# Altium PCB RADAR_D79_POWER_24V_v0.9.3.37_R10_3_37_REZONIT_IMPEDANCE_RECALC_ASCII.PcbDoc (part 7 of 8)
Units mil, origin at the board's own origin, x right, y up, seen from the top; angles counter-clockwise.
Board outline 3110.24 x 3110.24 mil, 10 copper layers (Top Layer, RF_GND, SIG_A0, SIG_A1, PWR_A, PWR_B, SIG_B1, SIG_B0, DIGITAL_GND, Bottom Layer), stack 80 mil thick; 304 components, 269 nets, 1408 pads, 1372 vias.
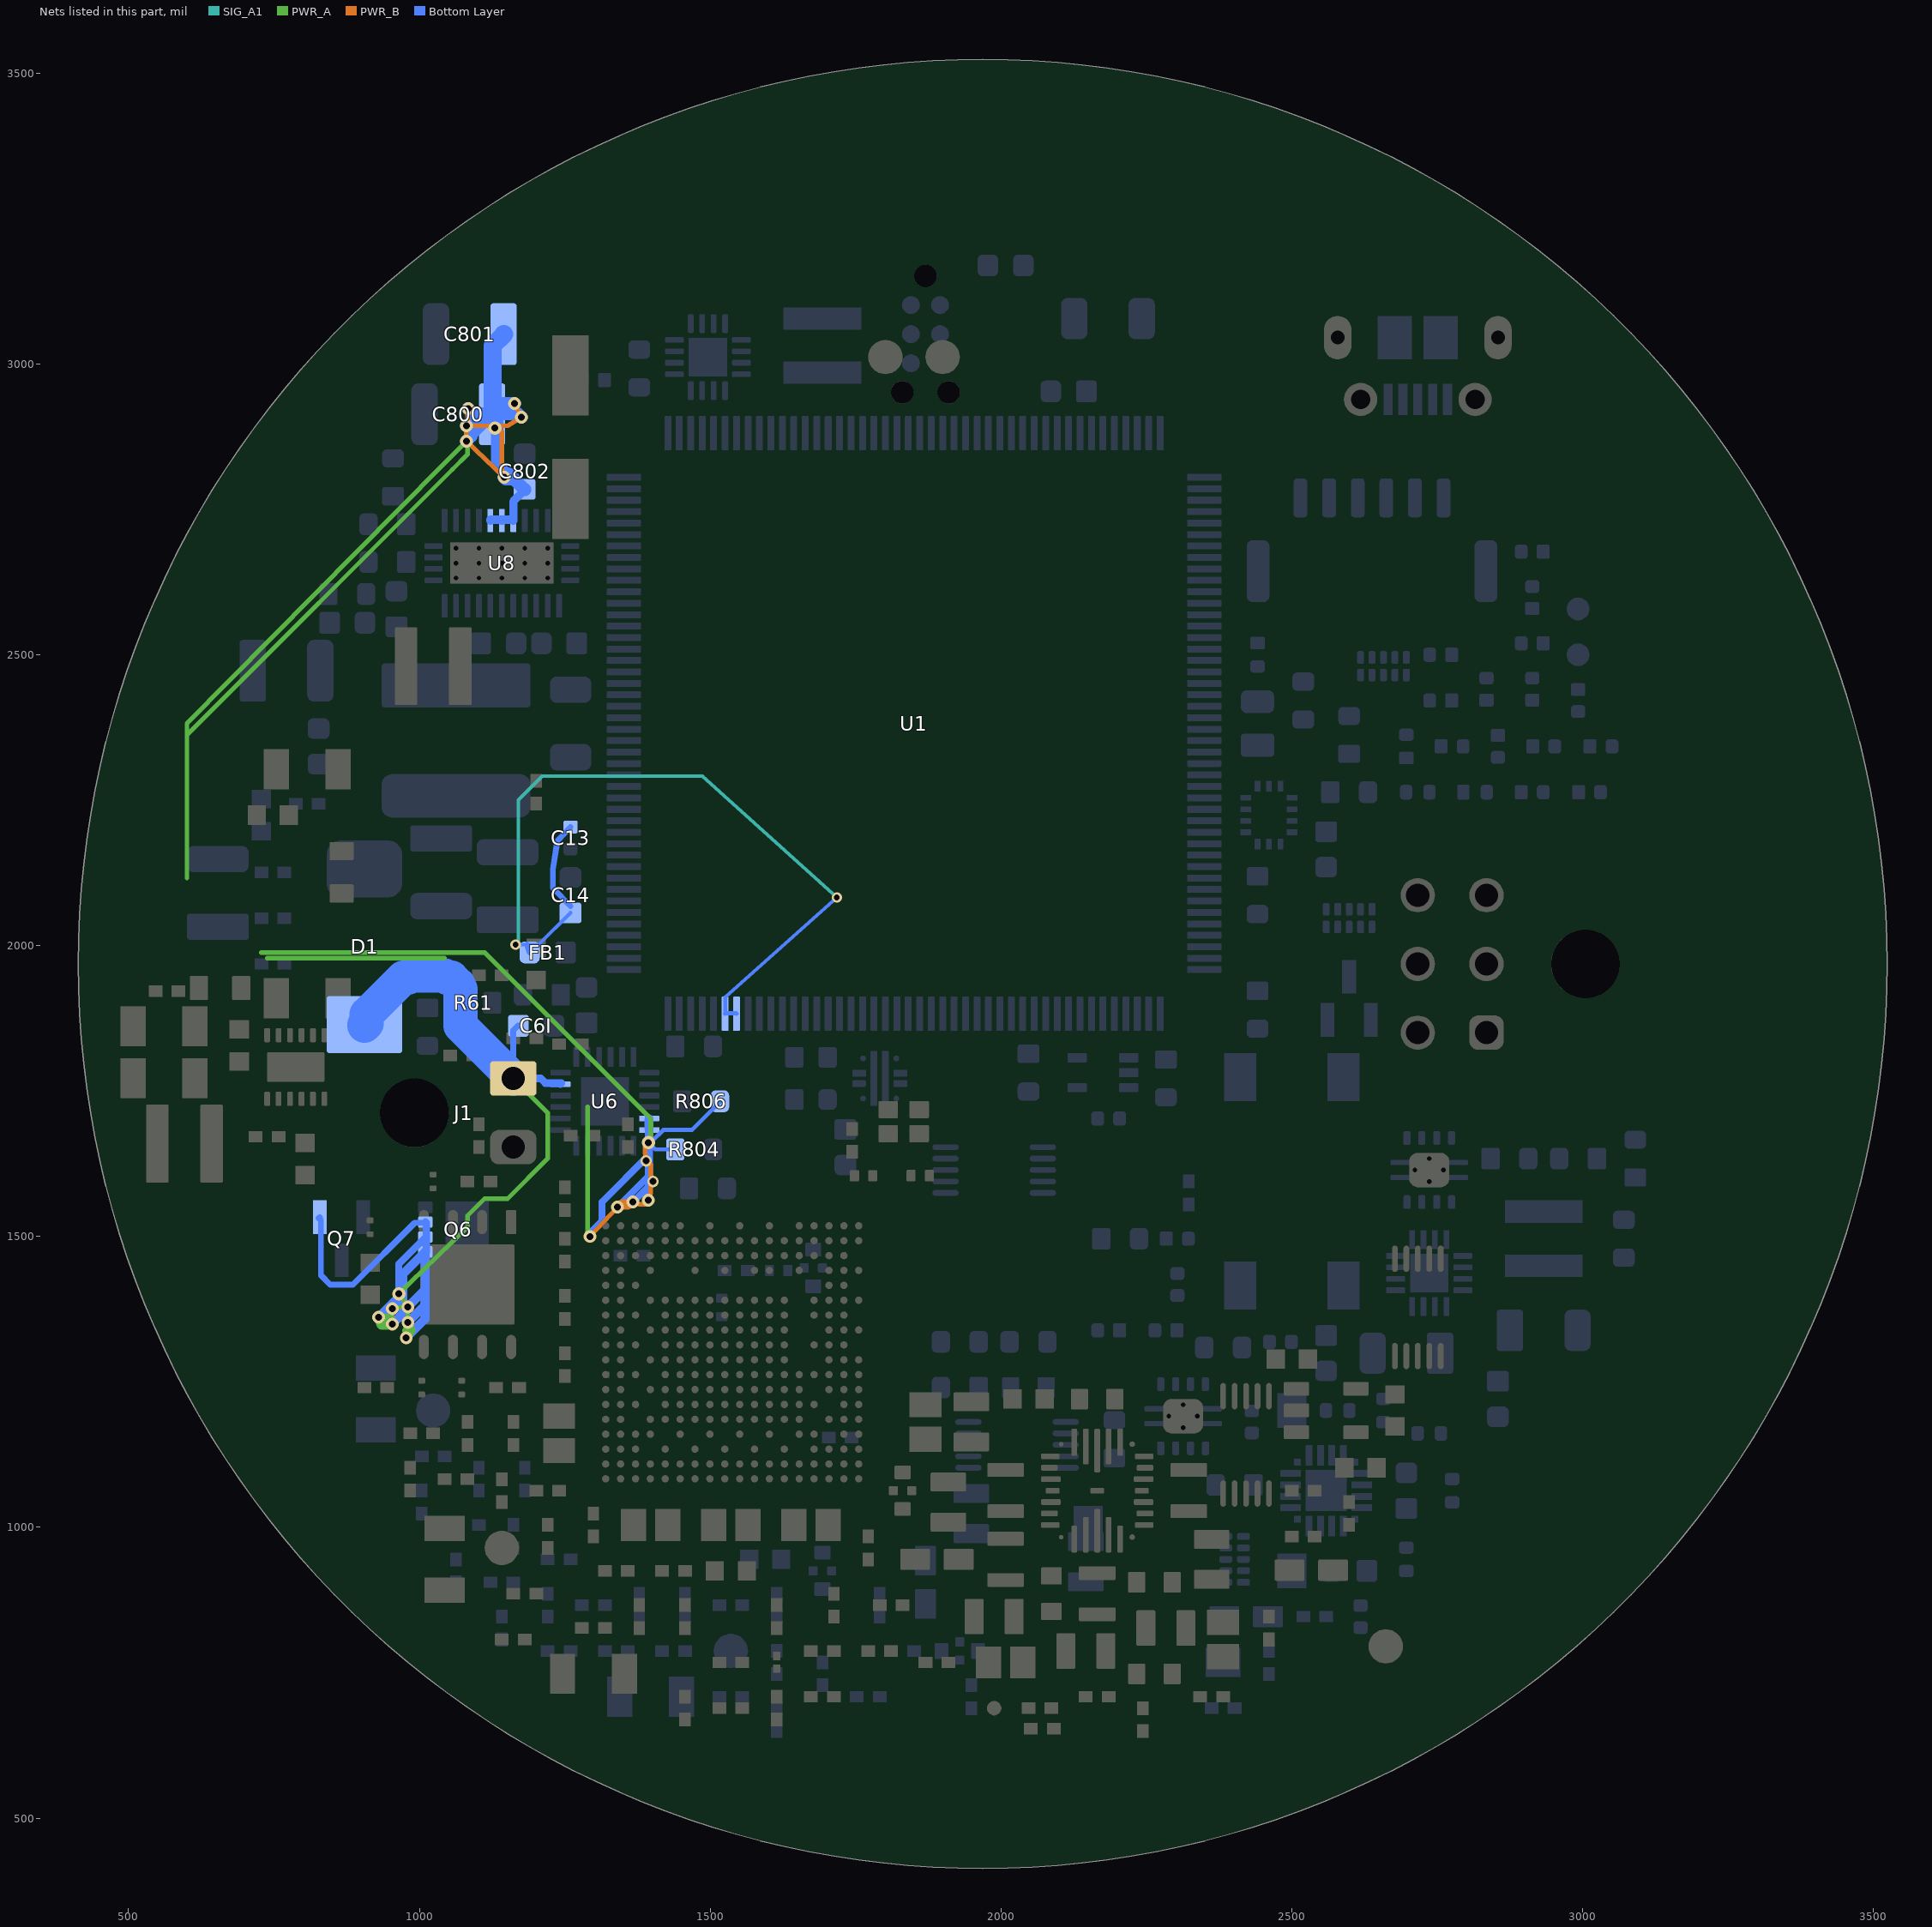
[diagram p13: the nets of this part, all layers, seen from the top]

## Via types
v1: diameter 13.77, hole 5.9, Top Layer to SIG_A0, tented both sides, 513 vias
v2: diameter 19.68, hole 9.84, Top Layer to Bottom Layer, tented both sides, 196 vias
v3: diameter 17.72, hole 9.84, Top Layer to Bottom Layer, tented both sides, 188 vias
v4: diameter 13.77, hole 5.9, Top Layer to SIG_A0, tented top, 104 vias
v5: diameter 13.78, hole 5.91, Top Layer to SIG_A0, tented both sides, 83 vias
v6: diameter 13.78, hole 5.91, SIG_B0 to Bottom Layer, tented both sides, 74 vias
v7: diameter 13.78, hole 5.91, Top Layer to SIG_A0, tented bottom, 55 vias
v8: diameter 13.78, hole 5.91, SIG_B0 to Bottom Layer, tented top, 43 vias
v9: diameter 22.05, hole 11.81, Top Layer to Bottom Layer, tented both sides, 23 vias
v10: diameter 16.54, hole 7.87, SIG_B0 to Bottom Layer, tented both sides, 22 vias
v11: diameter 17.72, hole 9.84, Top Layer to Bottom Layer, 14 vias
v12: diameter 22.83, hole 11.81, Top Layer to Bottom Layer, tented both sides, 11 vias
v13: diameter 16.54, hole 7.87, Top Layer to Bottom Layer, tented both sides, 11 vias
v14: diameter 18.11, hole 9.06, Top Layer to Bottom Layer, tented both sides, 8 vias
v15: diameter 17.32, hole 8.66, Top Layer to Bottom Layer, tented both sides, 3 vias
v16: diameter 20.47, hole 9.84, Top Layer to Bottom Layer, tented both sides, 3 vias
v17: diameter 16.54, hole 7.87, Top Layer to Bottom Layer, 3 vias
v18: diameter 22.05, hole 11.02, Top Layer to Bottom Layer, tented both sides, 2 vias
v19: diameter 19.68, hole 11.81, Top Layer to Bottom Layer, tented both sides, 2 vias
v20: diameter 19.68, hole 9.84, SIG_A1 to Bottom Layer, tented both sides, 2 vias
v21: diameter 16.54, hole 7.87, SIG_A1 to SIG_B1, tented both sides, 2 vias
v22: diameter 16.54, hole 7.87, Top Layer to SIG_A1, 2 vias
v23: diameter 13.78, hole 5.91, Top Layer to SIG_A0, 2 vias
v24: diameter 18, hole 9.84, Top Layer to Bottom Layer, tented both sides, 1 vias
v25: diameter 19.68, hole 9.84, SIG_B0 to Bottom Layer, tented both sides, 1 vias
v26: diameter 17.32, hole 7.87, Top Layer to Bottom Layer, tented both sides, 1 vias
v27: diameter 17.32, hole 7.87, SIG_A1 to Bottom Layer, tented both sides, 1 vias
v28: diameter 19.68, hole 9.84, SIG_B1 to Bottom Layer, tented both sides, 1 vias
v29: diameter 16.54, hole 7.87, PWR_B to SIG_A0, tented both sides, 1 vias

## Nets (pads, with @x,y where several pads share a name; then routed paths per layer and width w, separated by ;. In a path a pad name is that pad's centre, name@x,y a point inside that pad or via, vN(x,y) a via of type N, cw(c..) or ccw(c..) an arc to the next point about the centre after c; other vN are vias at no path point) (continued)
VDDA_FILTERED: C13.1 C14.1 FB1.2 U1.38 U1.39 | length 1492.1
  SIG_A1 w6.3: v3(1165.35,2001.57) 1170.08,2006.3 1170.08,2250.39 1211.02,2291.34 1486.61,2291.34 v3(1717.52,2082.68)
  Bottom Layer w6.3: v3(1165.35,2001.57) 1204.72,2001.57 1259.84,2056.69 C14.1@1259.84,2056.1 ; U1.39@1525.59,1882.87 1525.98,1883.46 1525.98,1911.81 v3(1717.52,2082.68)
  Bottom Layer w7.09: U1.39@1525.59,1882.87 1526.57,1883.86 1544.29,1883.86 U1.38@1545.28,1882.87
  Bottom Layer w9.84: FB1.2@1185.04,2001.57 FB1.2@1189.47,1988.19 ; C14.1@1259.84,2067.52 1229.33,2099.41 1229.33,2130.91 1237.2,2180.12 C13.1@1259.84,2203.94
VIN_PROTECTED_24V: C800.1 C801.1 C802.1 R804.1 R806.2 U6.17 U6.18 U8.20 U8.21 U8.22 | length 5751.8
  PWR_A w7.87: 728.35,1988.19 1112.2,1988.19 1385.56,1714.83 1397.64,1702.76 1397.64,1673.23 v12(1393.7,1661.42) ; 738.19,1978.35 1043.31,1978.35 ; 1289.37,1722.44 1289.37,1557.86 1289.37,1505.91 v9(1293.31,1500) ; 600.39,2116.14 600.39,2381.89 1039.16,2825.16 v9(1080.71,2867.13) 1082.68,2854.33 1082.68,2844.49 1057.03,2818.84 600.39,2362.2 600.39,2116.14
  PWR_B w7.87: v9(1083.66,2923.23) 1082.68,2913.39 1082.68,2903.54 v9(1080.71,2893.7) ; v9(1163.39,2932.09) v9(1175.2,2908.46) 1151.57,2893.7 1141.73,2893.7 v12(1129.92,2889.76) ; v9(1293.31,1500) v9(1340.55,1550.2) 1348.43,1555.12 1358.27,1555.12 v9(1367.13,1559.06) 1377.95,1555.12 1387.8,1555.12 v9(1393.7,1562.01) 1397.64,1574.8 1397.64,1584.65 v19(1401.57,1594.49) 1397.64,1604.33 1397.64,1624.02 v19(1389.76,1629.92) 1387.8,1643.7 1387.8,1653.54 v12(1393.7,1661.42) ; v9(1080.71,2893.7) 1122.05,2893.7 v12(1129.92,2889.76) ; v9(1080.71,2893.7) v9(1080.71,2867.13) v9(1145.67,2805.12) 1141.73,2814.96 1141.73,2883.86 v12(1129.92,2889.76)
  PWR_B w17.72: v9(1340.55,1550.2) 1348.43,1555.12 1358.27,1555.12 v9(1367.13,1559.06)
  Bottom Layer w7.09: R804.1@1439.96,1649.61 1405.51,1649.61 v12(1393.7,1661.42) 1395.67,1663.39 1399.61,1663.39 1419.29,1683.07 1468.5,1683.07 1517.72,1732.28 R806.2@1516.73,1732.28
  Bottom Layer w11.81: C800.1@1125,2913.39 1125.98,2913.39 1125.98,2893.7 v12(1129.92,2889.76) ; v9(1293.31,1500) 1296.26,1502.95 1296.26,1508.86 1313.98,1526.57 1313.98,1559.06 1393.7,1638.78 1393.7,1683.07 U6.18@1395.18,1683.07 ; v9(1340.55,1550.2) 1393.7,1603.35 U6.17@1393.7,1703.74 ; v9(1367.13,1559.06) 1393.7,1585.63 U6.17@1393.7,1703.74 ; v19(1389.76,1629.92) 1395.67,1635.83 1395.67,1683.07 U6.18@1395.18,1683.07 ; v9(1393.7,1562.01) U6.17@1393.7,1703.74 ; v12(1393.7,1661.42) 1393.7,1685.04 U6.18@1395.18,1683.07 ; v19(1401.57,1594.49) 1395.67,1600.39 1395.67,1702.76 U6.17@1395.18,1702.76 U6.17@1393.7,1703.74
  Bottom Layer w13.78: U8.22@1161.42,2730.81 1161.42,2732.28 1161.42,2763.78 1181.1,2783.46 C802.1@1181.1,2784.45 ; U6.18@1395.18,1683.07 1393.7,1685.04 1393.7,1700.79 U6.17@1395.18,1702.76
  Bottom Layer w14.96: U8.20@1122.05,2730.81 1122.05,2732.28 U8.21@1141.73,2732.28 ; U8.21@1141.73,2730.81 U8.21@1141.73,2732.28 ; U8.22@1161.42,2730.81 1161.42,2732.28 U8.21@1141.73,2732.28
  Bottom Layer w21.65: v9(1080.71,2867.13) 1089.57,2875.98 1089.57,2878.94 C800.1@1125,2914.37 ; v9(1080.71,2893.7) 1101.38,2914.37 C800.1@1125,2914.37 ; v9(1083.66,2923.23) 1092.52,2914.37 C800.1@1125,2914.37 ; v9(1145.67,2805.12) 1148.62,2802.17 1163.39,2802.17 C802.1@1181.1,2784.45 1181.1,2783.46 1153.54,2811.02 1149.61,2811.02 1133.86,2826.77 1133.86,2905.51 1125.98,2913.39 C800.1@1125,2913.39 C800.1@1125,2914.37 ; v9(1163.39,2932.09) 1142.72,2932.09 C800.1@1125,2914.37 ; v9(1175.2,2908.46) 1169.29,2914.37 C800.1@1125,2914.37
  Bottom Layer w31.5: C800.1@1125,2913.39 1125.98,2913.39 1125.98,3031.5 1145.67,3051.18 C801.1@1144.69,3051.18
VIN_RAW: C6I.1 D1.1 J1.1 Q6.1 Q6.2 Q6.3 Q7.2 R61.1 U6.5 | length 2773.8
  PWR_A w7.87: v9(930.12,1361.22) 935.04,1348.43 944.88,1348.43 v9(953.74,1349.41) v9(953.74,1375.98) 964.57,1377.95 974.41,1377.95 v9(980.32,1378.94) ; v9(977.36,1325.79) 974.41,1338.58 v9(980.32,1352.36) v9(980.32,1378.94) ; J1.1@1161.42,1771.65 1203.18,1729.9 1220.47,1712.6 1220.47,1633.86 1151.57,1564.96 1112.2,1564.96 1082.68,1535.43 1082.68,1515.75 1007.03,1442.62 v12(964.57,1401.57) v9(980.32,1378.94)
  PWR_A w17.72: v9(977.36,1325.79) 984.25,1338.58 v9(980.32,1352.36) ; v9(930.12,1361.22) 935.04,1358.27 944.88,1358.27 v9(953.74,1349.41) 944.88,1348.43 935.04,1348.43 v9(930.12,1361.22)
  Bottom Layer w9.84: R61.1@1060.04,1901.57 1059.06,1901.57 1094.49,1866.14 1094.49,1838.58 J1.1@1161.42,1771.65
  Bottom Layer w10.24: Q7.2@828.74,1532.97 826.77,1531.5 830.71,1527.56 830.71,1433.07 846.46,1417.32 885.83,1417.32 992.13,1523.62 1011.81,1523.62 Q6.3@1010.24,1524.8
  Bottom Layer w10.63: J1.1@1161.42,1771.65 1161.42,1854.33 1169.29,1862.2 C6I.1@1170.28,1862.2
  Bottom Layer w12.2: v12(964.57,1401.57) 964.57,1452.76 1011.81,1500 Q6.2@1010.24,1498.82
  Bottom Layer w12.6: Q6.1@1010.24,1473.62 1011.81,1472.44 Q6.2@1011.81,1500 ; Q6.2@1010.24,1498.82 Q6.2@1011.81,1500 ; Q6.3@1010.24,1524.8 1011.81,1523.62 Q6.2@1011.81,1500
  Bottom Layer w12.99: J1.1@1161.42,1771.65 1208.66,1771.65 1216.54,1763.78 1244.09,1763.78 U6.5@1242.62,1761.81
  Bottom Layer w14.96: v9(930.12,1361.22) 971.46,1402.56 971.46,1435.04 ; v9(953.74,1349.41) 971.46,1367.13 971.46,1435.04 ; v9(953.74,1375.98) 971.46,1393.7 971.46,1435.04 ; v9(977.36,1325.79) 1009.84,1358.27 Q6.1@1009.84,1473.43 ; v9(980.32,1352.36) 1009.84,1381.89 Q6.1@1009.84,1473.43 ; v9(980.32,1378.94) 1009.84,1408.46 Q6.1@1009.84,1473.43 ; Q6.1@1010.24,1473.62 Q6.1@1009.84,1473.43 ; 971.46,1435.04 Q6.1@1009.84,1473.43
  Bottom Layer w59.06: D1.1@905.51,1864.17 905.51,1862.2 909.45,1866.14 909.45,1881.89 972.44,1944.88 980.32,1944.88 984.25,1948.82 1043.31,1948.82 1047.24,1944.88 1055.12,1944.88 1066.93,1933.07 1066.93,1929.13 1070.87,1925.2 1070.87,1862.2 J1.1@1161.42,1771.65
pads on no net: D3.6 D3.7 D3.9 D3.10 D8.5 D8.6 D8.7 D8.9 D8.10 D_USB.5 D_USB.6 D_USB.7 D_USB.9 D_USB.10 J1.Un1 J6.Un1 J8.5 J8.MP J10.Un1 J10.Un2 J10.Un3 JUSB1.4 JUSB1.7 JUSB1.8 Q6.Un1 Q6.Un2 Q6.Un3 Q6.Un4 Q6.Un5 Q6.Un6 Q6.Un7 Q6.Un8 RAD_U2.11 RAD_U9.3 RAD_U11.3 RAD_U12.3 RAD_U22.3 RAD_U27.4 U1.3 U1.4 U1.5 U1.7 U1.8 U1.9 U1.10 U1.11 U1.12 U1.13 U1.16 U1.17 U1.18 U1.19 U1.20 U1.21 U1.24 U1.25 U1.26 U1.27 U1.28 U1.30 U1.32 U1.33 U1.34 U1.35 U1.41 U1.42 U1.43 U1.44 U1.45 U1.46 U1.47 U1.50 U1.51 U1.52 U1.53 U1.54 U1.55 U1.56 U1.57 U1.58 U1.59 U1.60 U1.63 U1.64 U1.65 U1.66 U1.67 U1.68 U1.69 U1.70 U1.73 U1.74 U1.75 U1.76 U1.77 U1.78 U1.83 U1.84 U1.85 U1.86 U1.87 U1.88 U1.89 U1.98 U1.99 U1.100 U1.101 U1.104 U1.105 U1.106 U1.107 U1.108 U1.109 U1.110 U1.111 U1.112 U1.115 U1.116 U1.117 U1.118 U1.119 U1.122 U1.123 U1.128 U1.129 U1.130 U1.131 U1.132 U1.133 U1.134 U1.138 U1.139 U1.140 U1.141 U1.144 U1.145 U1.146 U1.151 U1.152 U1.153 U1.154 U1.155 U1.156 U1.157 U1.160 U1.162 U1.163 U1.164 U1.165 U1.167 U1.168 U1.169 U1.170 U1.173 U1.174 U1.175 U1.176 U2.2 U2.3 U2.10 U2.11 U4.Un1 U4.Un2 U4.Un3 U4.Un4 U4.Un5 U5.7 U5.8 U5.Un1 U5.Un2 U5.Un3 U5.Un4 U6.12 U6.13 U6.19 U6.20 U6.21 U6.22 U6.23 U6.24 U6.Un1 U6.Un2 U6.Un3 U6.Un4 U7.3 U7.10 U7.Un1 U7.Un2 U7.Un3 U7.Un4 U8.7 U8.11 U8.23 U8.Un1 U8.Un2 U8.Un3 U8.Un4 U8.Un5 U8.Un6 U8.Un7 U8.Un8 U9.7 U9.8 U9.Un1 U9.Un2 U9.Un3 U9.Un4 U_CAN_RAD.Un1 U_CAN_RAD.Un2 U_CAN_RAD.Un3 U_CAN_RAD.Un4 U_CAN_RAD.Un5 U_FRAME.1 U_USB.1 U_USB.2 U_USB.10 U_USB.11 U_USB.14 U_USB.16 U_USB.19 U_USB.20 U_USB.P1 U_USB.P2 U_USB.P3 U_USB.P4 Y1.1

## Polygon pours and split planes (outlines as drawn)
TI_NetC21_2 on Top Layer "TI_NetC21_2" (solid, remove dead copper, pour order 0): 744.76,1750.23 615.47,1750.23 615.47,1558.2 737.3,1558.2 737.3,1699.8 744.76,1699.8
RADAR_12V on Top Layer "RADAR_12V" (solid, remove dead copper, pour order 1): 812.99,1930.08 748.03,1865.12 748.03,1834.07 665.45,1834.07 665.45,1968.5 812.99,1968.5
GND on Top Layer "GND" (solid, remove dead copper, pour order 2): 812.99,1756.35 598.43,1756.35 598.43,1968.5 640.28,1968.5 640.28,1814.86 812.99,1814.86
GND on SIG_A0 "GND1_REFERENCE" (solid, remove dead copper, pour order 3): 96 vertices, not listed, extent 454.72,454.72 2635.41,3482.28
GND on SIG_B0 "GND2_REFERENCE" (solid, remove dead copper, pour order 4): 145 vertices, not listed, extent 462.6,462.6 3474.41,3474.41
GND on Bottom Layer "GND_BOTTOM_RETURN" (solid, remove dead copper, pour order 5): 145 vertices, not listed, extent 462.6,462.6 3474.41,3474.41
GND on Top Layer "GND_COPLANAR_FEED_REFERENCE" (solid, remove dead copper, pour order 6): 2624.02,1830.71 2624.02,1200.79 1318.9,1200.79 1318.9,1830.71
GND on Top Layer "GND_TOP_DIGITAL_RETURN" (solid, remove dead copper, pour order 7): 1141.73,748.03 2066.93,748.03 2066.93,1190.94 1141.73,1190.94
GND on RF_GND "RF_GND_REFERENCE" (solid, remove dead copper, pour order 17): 96 vertices, not listed, extent 454.72,454.72 2635.41,3482.28
GND on DIGITAL_GND "DIGITAL_GND_REFERENCE" (solid, remove dead copper, pour order 18): 96 vertices, not listed, extent 454.72,454.72 2635.41,3482.28
TI_PVIN3V3 on PWR_A "R10_3_28_TI_PVIN3V3_19" (solid, pour order 19): 1843.82,838.63 1838.53,828.07 1872.72,810.97 1878,821.54
TI_PVIN3V3 on PWR_A "R10_3_28_TI_PVIN3V3_20" (solid, pour order 20): 1864.17,824.8 1864.17,812.99 1903.54,812.99 1903.54,824.8
TI_PVIN3V3 on PWR_A "R10_3_28_TI_PVIN3V3_21" (solid, pour order 21): 2435.34,812.62 2423.6,811.32 2425.89,790.72 2437.62,792.03
TI_PVIN3V3 on PWR_A "R10_3_28_TI_PVIN3V3_22" (solid, pour order 22): 2437.01,803.15 2425.2,803.15 2425.2,781.5 2437.01,781.5
TI_PVIN3V3 on PWR_A "R10_3_28_TI_PVIN3V3_23" (solid, pour order 23): 2434.39,795.08 2423.43,790.69 2429.78,774.8 2440.75,779.19
TI_PVIN3V3 on PWR_A "R10_3_28_TI_PVIN3V3_24" (solid, pour order 24): 1892.78,825.69 1890.84,814.04 1914.3,810.13 1916.24,821.78
TI_PVIN3V3 on PWR_A "R10_3_28_TI_PVIN3V3_25" (solid, pour order 25): 1903.54,822.83 1903.54,811.02 1954.72,811.02 1954.72,822.83
TI_PVIN3V3 on PWR_A "R10_3_28_TI_PVIN3V3_26" (solid, pour order 26): 1940.47,817.23 1948.52,808.58 1962.81,821.88 1954.77,830.53
TI_PVIN3V3 on PWR_A "R10_3_28_TI_PVIN3V3_27" (solid, pour order 27): 1921.08,823.39 1953.26,788.8 2046.05,875.11 2013.87,909.7
TI_PVIN3V3 on PWR_A "R10_3_28_TI_PVIN3V3_28" (solid, pour order 28): 2004.32,876.62 2012.36,867.97 2064.25,916.23 2056.21,924.88
TI_PVIN3V3 on PWR_A "R10_3_28_TI_PVIN3V3_29" (solid, pour order 29): 2062.55,911.48 2060.96,923.18 2040.59,920.41 2042.19,908.71
TI_PVIN3V3 on PWR_A "R10_3_28_TI_PVIN3V3_30" (solid, pour order 30): 2053.15,909.45 2053.15,921.26 2031.5,921.26 2031.5,909.45
TI_PVIN3V3 on PWR_A "R10_3_28_TI_PVIN3V3_31" (solid, pour order 31): 2037.4,907 2045.75,915.35 2027.56,933.55 2019.21,925.2
TI_PVIN3V3 on PWR_A "R10_3_28_TI_PVIN3V3_32" (solid, pour order 32): 2021.65,919.29 2033.46,919.29 2033.46,957.65 2021.65,957.65
TI_PVIN3V3 on PWR_A "R10_3_28_TI_PVIN3V3_33" (solid, pour order 33): 2003.94,928.13 2051.18,928.13 2051.18,1037.24 2003.94,1037.24
TI_PVIN3V3 on PWR_A "R10_3_28_TI_PVIN3V3_34" (solid, pour order 34): 2021.65,1007.71 2033.46,1007.71 2033.46,1049.21 2021.65,1049.21
TI_PVIN3V3 on PWR_A "R10_3_28_TI_PVIN3V3_35" (solid, pour order 35): 2019.24,1042.52 2028.35,1034.99 2054.57,1066.74 2045.47,1074.26
TI_PVIN3V3 on PWR_A "R10_3_28_TI_PVIN3V3_36" (solid, pour order 36): 2046.72,1057.61 2054.6,1066.41 2027.1,1091.02 2019.22,1082.21
TI_PVIN3V3 on PWR_A "R10_3_28_TI_PVIN3V3_37" (solid, pour order 37): 2021.65,1076.77 2033.46,1076.77 2033.46,1122.54 2021.65,1122.54
TI_PVIN3V3 on PWR_A "R10_3_28_TI_PVIN3V3_38" (solid, pour order 38): 2003.94,1093.02 2051.18,1093.02 2051.18,1175.2 2003.94,1175.2
TI_PVIN3V3 on PWR_A "R10_3_28_TI_PVIN3V3_39" (solid, pour order 39): 1994.15,1151.57 2027.56,1118.17 2070.81,1161.42 2037.4,1194.82
TI_PVIN3V3 on PWR_A "R10_3_28_TI_PVIN3V3_40" (solid, pour order 40): 2013.78,1185.04 2013.78,1137.8 2139.32,1137.8 2139.32,1185.04
TI_PVIN3V3 on PWR_A "R10_3_28_TI_PVIN3V3_41" (solid, pour order 41): 2109.79,1167.32 2109.79,1155.51 2141.73,1155.51 2141.73,1167.32
TI_PVIN3V3 on PWR_A "R10_3_28_TI_PVIN3V3_42" (solid, pour order 42): 2127.49,1160.85 2136.39,1153.09 2169.75,1191.32 2160.85,1199.08
TI_PVIN3V3 on PWR_A "R10_3_28_TI_PVIN3V3_43" (solid, pour order 43): 2169.72,1191.63 2160.54,1199.05 2137.36,1170.38 2146.55,1162.95
TI_PVIN3V3 on PWR_A "R10_3_28_TI_PVIN3V3_44" (solid, pour order 44): 2151.57,1165.35 2151.57,1177.17 2111.52,1177.17 2111.52,1165.35
TI_PVIN3V3 on PWR_A "R10_3_28_TI_PVIN3V3_45" (solid, pour order 45): 2141.05,1147.64 2141.05,1194.88 2092.52,1194.88 2092.52,1147.64
TI_PVIN3V3 on PWR_A "R10_3_28_TI_PVIN3V3_46" (solid, pour order 46): 2116.14,1137.85 2149.55,1171.26 2079.36,1241.44 2045.96,1208.04
TI_PVIN3V3 on PWR_A "R10_3_28_TI_PVIN3V3_47" (solid, pour order 47): 2079.36,1199.69 2087.72,1208.04 2047.24,1248.51 2038.89,1240.16
TI_PVIN3V3 on PWR_A "R10_3_28_TI_PVIN3V3_48" (solid, pour order 48): 2041.34,1234.25 2053.15,1234.25 2053.15,1253.94 2041.34,1253.94
TI_PVIN3V3 on PWR_A "R10_3_28_TI_PVIN3V3_49" (solid, pour order 49): 2169.72,1191.63 2160.54,1199.05 2137.36,1170.38 2146.55,1162.95
TI_PVIN3V3 on PWR_A "R10_3_28_TI_PVIN3V3_50" (solid, pour order 50): 2151.57,1177.17 2139.76,1177.17 2139.76,1131.35 2151.57,1131.35
TI_PVIN3V3 on PWR_A "R10_3_28_TI_PVIN3V3_51" (solid, pour order 51): 2169.29,1160.88 2122.05,1160.88 2122.05,1108.27 2169.29,1108.27
TI_PVIN3V3 on PWR_A "R10_3_28_TI_PVIN3V3_52" (solid, pour order 52): 2145.67,1165.3 2112.26,1131.89 2155.51,1088.64 2188.92,1122.05
TI_PVIN3V3 on PWR_A "R10_3_28_TI_PVIN3V3_53" (solid, pour order 53): 2131.89,1145.67 2131.89,1098.43 2218.5,1098.43 2218.5,1145.67
TI_PVIN3V3 on PWR_A "R10_3_28_TI_PVIN3V3_54" (solid, pour order 54): 2194.88,1155.45 2161.48,1122.05 2222.98,1060.55 2256.38,1093.95
TI_PVIN3V3 on PWR_A "R10_3_28_TI_PVIN3V3_55" (solid, pour order 55): 2222.98,1102.3 2214.63,1093.95 2234.25,1074.33 2242.6,1082.68
TI_PVIN3V3 on PWR_A "R10_3_28_TI_PVIN3V3_56" (solid, pour order 56): 2228.35,1088.58 2228.35,1076.77 2283.27,1076.77 2283.27,1088.58
TI_PVIN3V3 on PWR_A "R10_3_28_TI_PVIN3V3_57" (solid, pour order 57): 2284.98,1086.1 2273.94,1090.3 2266,1069.41 2277.04,1065.22
TI_PVIN3V3 on PWR_A "R10_3_28_TI_PVIN3V3_58" (solid, pour order 58): 2279.53,1078.74 2267.72,1078.74 2267.72,1037.4 2279.53,1037.4
TI_PVIN3V3 on PWR_A "R10_3_28_TI_PVIN3V3_59" (solid, pour order 59): 2273.62,1051.66 2265.27,1043.31 2287.06,1021.52 2295.41,1029.87
TI_PVIN3V3 on PWR_A "R10_3_28_TI_PVIN3V3_60" (solid, pour order 60): 2287.06,1063.28 2253.65,1029.87 2342.52,941 2375.93,974.41
TI_PVIN3V3 on PWR_A "R10_3_28_TI_PVIN3V3_61" (solid, pour order 61): 2366.14,998.03 2318.9,998.03 2318.9,933.36 2366.14,933.36
TI_PVIN3V3 on PWR_A "R10_3_28_TI_PVIN3V3_62" (solid, pour order 62): 2348.43,962.88 2336.61,962.88 2336.61,948.82 2348.43,948.82
TI_PVIN3V3 on PWR_A "R10_3_28_TI_PVIN3V3_63" (solid, pour order 63): 2350.87,954.72 2342.52,963.08 2314.48,935.04 2322.83,926.69
TI_PVIN3V3 on PWR_A "R10_3_28_TI_PVIN3V3_64" (solid, pour order 64): 2328.74,929.13 2328.74,940.94 2297.24,940.94 2297.24,929.13
TI_PVIN3V3 on PWR_A "R10_3_28_TI_PVIN3V3_65" (solid, pour order 65): 2307.03,927.65 2310.54,938.92 2290.41,945.19 2286.9,933.91
TI_PVIN3V3 on PWR_A "R10_3_28_TI_PVIN3V3_66" (solid, pour order 66): 2046.72,1057.61 2054.6,1066.41 2027.1,1091.02 2019.22,1082.21
TI_PVIN3V3 on PWR_A "R10_3_28_TI_PVIN3V3_67" (solid, pour order 67): 2021.65,1076.77 2033.46,1076.77 2033.46,1122.54 2021.65,1122.54
TI_PVIN3V3 on PWR_A "R10_3_28_TI_PVIN3V3_68" (solid, pour order 68): 2003.94,1093.02 2051.18,1093.02 2051.18,1175.2 2003.94,1175.2
TI_PVIN3V3 on PWR_A "R10_3_28_TI_PVIN3V3_69" (solid, pour order 69): 1994.15,1151.57 2027.56,1118.17 2070.81,1161.42 2037.4,1194.82
TI_PVIN3V3 on PWR_A "R10_3_28_TI_PVIN3V3_70" (solid, pour order 70): 2013.78,1185.04 2013.78,1137.8 2090.55,1137.8 2090.55,1185.04
TI_PVIN3V3 on PWR_A "R10_3_28_TI_PVIN3V3_71" (solid, pour order 71): 2033.52,1161.42 2066.93,1128.01 2110.18,1171.26 2076.77,1204.67
TI_PVIN3V3 on PWR_A "R10_3_28_TI_PVIN3V3_72" (solid, pour order 72): 2053.15,1147.64 2100.39,1147.64 2100.39,1224.41 2053.15,1224.41
TI_PVIN3V3 on PWR_A "R10_3_28_TI_PVIN3V3_73" (solid, pour order 73): 2076.77,1167.38 2110.18,1200.79 2047.24,1263.72 2013.84,1230.32
TI_PVIN3V3 on PWR_A "R10_3_28_TI_PVIN3V3_74" (solid, pour order 74): 2070.87,1206.69 2070.87,1253.94 1994.09,1253.94 1994.09,1206.69
TI_PVIN3V3 on PWR_A "R10_3_28_TI_PVIN3V3_75" (solid, pour order 75): 2051.12,1230.32 2017.72,1263.72 1954.78,1200.79 1988.19,1167.38
TI_PVIN3V3 on PWR_A "R10_3_28_TI_PVIN3V3_76" (solid, pour order 76): 2011.81,1177.17 2011.81,1224.41 1954.72,1224.41 1954.72,1177.17
TI_PVIN3V3 on PWR_A "R10_3_28_TI_PVIN3V3_77" (solid, pour order 77): 2011.75,1200.79 1978.35,1234.19 1883.37,1139.22 1916.78,1105.82
TI_PVIN3V3 on PWR_A "R10_3_28_TI_PVIN3V3_78" (solid, pour order 78): 1925.13,1139.22 1916.78,1147.57 1881.41,1112.2 1889.76,1103.85
TI_PVIN3V3 on PWR_A "R10_3_28_TI_PVIN3V3_79" (solid, pour order 79): 1895.67,1106.3 1895.67,1118.11 1874.02,1118.11 1874.02,1106.3
TI_PVIN3V3 on PWR_A "R10_3_28_TI_PVIN3V3_80" (solid, pour order 80): 1886.79,1107.45 1884.68,1119.07 1862.23,1114.99 1864.34,1103.37
TI_PVIN3V3 on PWR_A "R10_3_28_TI_PVIN3V3_81" (solid, pour order 81): 2300.64,943.22 2288.86,944.14 2286.96,919.77 2298.73,918.85
TI_PVIN3V3 on PWR_A "R10_3_28_TI_PVIN3V3_82" (solid, pour order 82): 2299.21,931.1 2287.4,931.1 2287.4,879.92 2299.21,879.92
TI_PVIN3V3 on PWR_A "R10_3_28_TI_PVIN3V3_83" (solid, pour order 83): 2301.66,885.83 2293.31,894.18 2279.97,880.84 2288.32,872.49
TI_PVIN3V3 on PWR_A "R10_3_28_TI_PVIN3V3_84" (solid, pour order 84): 2321.73,880.84 2288.32,914.25 2200.85,826.77 2234.25,793.37
TI_PVIN3V3 on PWR_A "R10_3_28_TI_PVIN3V3_85" (solid, pour order 85): 2257.87,803.15 2257.87,850.39 2181.1,850.39 2181.1,803.15
TI_PVIN3V3 on PWR_A "R10_3_28_TI_PVIN3V3_86" (solid, pour order 86): 2238.13,826.77 2204.72,860.18 2131.95,787.4 2165.35,754
TI_PVIN3V3 on PWR_A "R10_3_28_TI_PVIN3V3_87" (solid, pour order 87): 2188.98,811.02 2141.73,811.02 2141.73,704.72 2188.98,704.72
TI_PVIN3V3 on PWR_A "R10_3_28_TI_PVIN3V3_88" (solid, pour order 88): 2165.35,761.75 2131.95,728.35 2175.2,685.1 2208.6,718.5
TI_PVIN3V3 on PWR_A "R10_3_28_TI_PVIN3V3_89" (solid, pour order 89): 2151.57,742.13 2151.57,694.88 2326.77,694.88 2326.77,742.13
TI_PVIN3V3 on PWR_A "R10_3_28_TI_PVIN3V3_90" (solid, pour order 90): 2269.74,718.5 2303.15,685.1 2410.56,792.51 2377.16,825.92
TI_PVIN3V3 on PWR_A "R10_3_28_TI_PVIN3V3_91" (solid, pour order 91): 2368.8,792.51 2377.16,784.16 2400.08,807.09 2391.73,815.44
TI_PVIN3V3 on PWR_A "R10_3_28_TI_PVIN3V3_92" (solid, pour order 92): 2385.83,812.99 2385.83,801.18 2427.17,801.18 2427.17,812.99
TI_PVIN3V3 on PWR_A "R10_3_28_TI_PVIN3V3_93" (solid, pour order 93): 2416.04,813.61 2414.74,801.87 2435.34,799.58 2436.64,811.32
TI_PVIN3V3 on PWR_A "R10_3_28_TI_PVIN3V3_94" (solid, pour order 94): 2278.23,1090.98 2269.06,1083.55 2292.44,1054.69 2301.61,1062.12
TI_PVIN3V3 on PWR_A "R10_3_28_TI_PVIN3V3_95" (solid, pour order 95): 2299.21,1068.9 2287.4,1068.9 2287.4,1023.36 2299.21,1023.36
TI_PVIN3V3 on PWR_A "R10_3_28_TI_PVIN3V3_96" (solid, pour order 96): 2316.93,1052.89 2269.68,1052.89 2269.68,1000 2316.93,1000
TI_PVIN3V3 on PWR_A "R10_3_28_TI_PVIN3V3_97" (solid, pour order 97): 2293.31,1057.03 2259.9,1023.62 2342.52,941 2375.93,974.41
TI_PVIN3V3 on PWR_A "R10_3_28_TI_PVIN3V3_98" (solid, pour order 98): 2366.14,998.03 2318.9,998.03 2318.9,911.42 2366.14,911.42
TI_PVIN3V3 on PWR_A "R10_3_28_TI_PVIN3V3_99" (solid, pour order 99): 2375.93,935.04 2342.52,968.45 2200.85,826.77 2234.25,793.37
TI_PVIN3V3 on PWR_A "R10_3_28_TI_PVIN3V3_100" (solid, pour order 100): 2257.87,803.15 2257.87,850.39 2181.1,850.39 2181.1,803.15
TI_PVIN3V3 on PWR_A "R10_3_28_TI_PVIN3V3_101" (solid, pour order 101): 2238.13,826.77 2204.72,860.18 2131.95,787.4 2165.35,754
TI_PVIN3V3 on PWR_A "R10_3_28_TI_PVIN3V3_102" (solid, pour order 102): 2188.98,811.02 2141.73,811.02 2141.73,704.72 2188.98,704.72
TI_PVIN3V3 on PWR_A "R10_3_28_TI_PVIN3V3_103" (solid, pour order 103): 2165.35,761.75 2131.95,728.35 2175.2,685.1 2208.6,718.5
TI_PVIN3V3 on PWR_A "R10_3_28_TI_PVIN3V3_104" (solid, pour order 104): 2151.57,742.13 2151.57,694.88 2326.77,694.88 2326.77,742.13
TI_PVIN3V3 on PWR_A "R10_3_28_TI_PVIN3V3_105" (solid, pour order 105): 2269.74,718.5 2303.15,685.1 2494.04,875.98 2460.63,909.39
TI_PVIN3V3 on PWR_A "R10_3_28_TI_PVIN3V3_106" (solid, pour order 106): 2437.01,852.36 2484.25,852.36 2484.25,909.45 2437.01,909.45
TI_PVIN3V3 on PWR_A "R10_3_28_TI_PVIN3V3_107" (solid, pour order 107): 2427.22,885.83 2460.63,852.42 2523.56,915.35 2490.16,948.76
TI_PVIN3V3 on PWR_A "R10_3_28_TI_PVIN3V3_108" (solid, pour order 108): 2466.54,938.98 2466.54,891.73 2523.62,891.73 2523.62,938.98
TI_PVIN3V3 on PWR_A "R10_3_28_TI_PVIN3V3_109" (solid, pour order 109): 2466.59,915.35 2500,881.95 2553.09,935.04 2519.68,968.45
TI_PVIN3V3 on PWR_A "R10_3_28_TI_PVIN3V3_110" (solid, pour order 110): 2496.06,911.42 2543.31,911.42 2543.31,1047.24 2496.06,1047.24
TI_PVIN3V3 on PWR_A "R10_3_28_TI_PVIN3V3_111" (solid, pour order 111): 2486.28,1023.62 2519.68,990.22 2690.89,1161.42 2657.48,1194.82
TI_PVIN3V3 on PWR_A "R10_3_28_TI_PVIN3V3_112" (solid, pour order 112): 2633.86,1185.04 2633.86,1137.8 2740.16,1137.8 2740.16,1185.04
TI_PVIN3V3 on PWR_A "R10_3_28_TI_PVIN3V3_113" (solid, pour order 113): 2683.13,1161.42 2716.54,1128.01 2809,1220.47 2775.59,1253.88
TI_PVIN3V3 on PWR_A "R10_3_28_TI_PVIN3V3_114" (solid, pour order 114): 2751.97,1196.85 2799.21,1196.85 2799.21,1303.15 2751.97,1303.15
TI_PVIN3V3 on PWR_A "R10_3_28_TI_PVIN3V3_115" (solid, pour order 115): 2775.59,1246.12 2809,1279.53 2706.69,1381.83 2673.29,1348.43
TI_PVIN3V3 on PWR_A "R10_3_28_TI_PVIN3V3_116" (solid, pour order 116): 2730.32,1324.8 2730.32,1372.05 2486.22,1372.05 2486.22,1324.8
TI_PVIN3V3 on PWR_A "R10_3_28_TI_PVIN3V3_117" (solid, pour order 117): 2543.23,1347.43 2510.84,1381.82 2437.94,1313.14 2470.34,1278.76
TI_PVIN3V3 on PWR_A "R10_3_28_TI_PVIN3V3_118" (solid, pour order 118): 2479.68,1311.9 2471.58,1320.5 2420,1271.9 2428.1,1263.31
TI_1V2 on PWR_A "R10_3_28_TI_1V2_119" (solid, pour order 119): 1285.43,890.75 1285.43,880.91 1333.66,880.91 1333.66,890.75
TI_1V2 on PWR_A "R10_3_28_TI_1V2_120" (solid, pour order 120): 1328.74,892.79 1321.78,885.83 1349.41,858.2 1356.37,865.16
TI_1V2 on PWR_A "R10_3_28_TI_1V2_121" (solid, pour order 121): 1482.29,886.23 1478.93,876.98 1499.01,869.68 1502.37,878.93
TI_1V2 on PWR_A "R10_3_28_TI_1V2_122" (solid, pour order 122): 1491.14,880.91 1491.14,871.06 1579.72,871.06 1579.72,880.91
TI_1V2 on PWR_A "R10_3_28_TI_1V2_123" (solid, pour order 123): 1567.87,875.41 1575.38,869.05 1592.57,889.36 1585.05,895.72
TI_1V2 on PWR_A "R10_3_28_TI_1V2_124" (solid, pour order 124): 1296.26,1397.71 1289.3,1390.75 1348.43,1331.62 1355.38,1338.58
TI_1V2 on PWR_A "R10_3_28_TI_1V2_125" (solid, pour order 125): 1343.5,1343.5 1343.5,1333.66 1373.03,1333.66 1373.03,1343.5
TI_1V2 on PWR_A "R10_3_28_TI_1V2_126" (solid, pour order 126): 1361.4,1340.41 1366.28,1331.87 1381.71,1340.69 1376.83,1349.23
TI_1V2 on PWR_A "R10_3_28_TI_1V2_127" (solid, pour order 127): 1368.15,1343.75 1373.77,1335.67 1404.49,1357.04 1398.87,1365.12
TI_1V2 on PWR_A "R10_3_28_TI_1V2_128" (solid, pour order 128): 1393.29,1352.83 1403.07,1353.92 1401,1372.56 1391.22,1371.47
TI_1V2 on PWR_B "R10_3_28_TI_1V2_129" (solid, pour order 129): 2201.71,688.62 2209.02,682.03 2269.75,749.38 2262.44,755.97
TI_1V2 on PWR_A "R10_3_28_TI_1V2_130" (solid, pour order 130): 1290.4,878.87 1297.31,885.87 1258.58,924.12 1251.67,917.12
TI_1V2 on PWR_A "R10_3_28_TI_1V2_131" (solid, pour order 131): 1258.78,892.11 1283.68,917.32 1226.74,973.56 1201.84,948.35
TI_1V2 on PWR_A "R10_3_28_TI_1V2_132" (solid, pour order 132): 1226.94,941.54 1233.85,948.55 1210.59,971.53 1203.67,964.52
TI_1V2 on PWR_A "R10_3_28_TI_1V2_133" (solid, pour order 133): 1215.55,959.65 1215.55,969.49 1195.87,969.49 1195.87,959.65
TI_1V2 on PWR_A "R10_3_28_TI_1V2_134" (solid, pour order 134): 1207.3,962.12 1203.23,971.08 1183.44,962.09 1187.52,953.13
TI_1V2 on PWR_A "R10_3_28_TI_1V2_135" (solid, pour order 135): 1189.46,952.7 1196.9,959.15 1152.07,1010.88 1144.63,1004.43
TI_1V2 on PWR_A "R10_3_28_TI_1V2_136" (solid, pour order 136): 1146.65,999.02 1156.5,999.02 1156.5,1009.3 1146.65,1009.3
TI_1V2 on PWR_A "R10_3_28_TI_1V2_137" (solid, pour order 137): 1133.86,986.67 1169.29,986.67 1169.29,1070.87 1133.86,1070.87
TI_1V2 on PWR_A "R10_3_28_TI_1V2_138" (solid, pour order 138): 1151.57,1028.09 1176.63,1053.15 1102.36,1127.42 1077.31,1102.36
TI_1V2 on PWR_A "R10_3_28_TI_1V2_139" (solid, pour order 139): 1120.08,1084.65 1120.08,1120.08 976.38,1120.08 976.38,1084.65
TI_1V2 on PWR_A "R10_3_28_TI_1V2_140" (solid, pour order 140): 1019.15,1102.36 994.09,1127.42 939.51,1072.83 964.57,1047.78
TI_1V2 on PWR_A "R10_3_28_TI_1V2_141" (solid, pour order 141): 982.28,1090.55 946.85,1090.55 946.85,1035.43 982.28,1035.43
TI_1V2 on PWR_A "R10_3_28_TI_1V2_142" (solid, pour order 142): 964.57,1078.2 939.51,1053.15 1004.25,988.41 1029.31,1013.47
TI_1V2 on PWR_A "R10_3_28_TI_1V2_143" (solid, pour order 143): 1004.25,1020.43 997.29,1013.47 1023.62,987.13 1030.58,994.09
TI_1V2 on PWR_A "R10_3_28_TI_1V2_144" (solid, pour order 144): 1028.54,999.02 1018.7,999.02 1018.7,969.49 1028.54,969.49
TI_1V2 on PWR_A "R10_3_28_TI_1V2_145" (solid, pour order 145): 1029.29,978.45 1019.58,980.07 1015.99,958.55 1025.7,956.93
TI_1V2 on PWR_A "R10_3_28_TI_1V2_146" (solid, pour order 146): 1343.97,869.51 1345.06,859.72 1363.7,861.79 1362.62,871.58
TI_1V2 on PWR_A "R10_3_28_TI_1V2_147" (solid, pour order 147): 1353.35,871.06 1353.35,861.22 1373.03,861.22 1373.03,871.06
TI_1V2 on PWR_A "R10_3_28_TI_1V2_148" (solid, pour order 148): 1361.15,866.14 1368.11,859.18 1403.57,894.64 1396.61,901.6
TI_1V2 on PWR_A "R10_3_28_TI_1V2_149" (solid, pour order 149): 1371.55,894.64 1396.61,869.58 1442.38,915.35 1417.32,940.41
TI_1V2 on PWR_A "R10_3_28_TI_1V2_150" (solid, pour order 150): 1399.61,933.07 1399.61,897.64 1454.72,897.64 1454.72,933.07
TI_1V2 on PWR_A "R10_3_28_TI_1V2_151" (solid, pour order 151): 1437.01,940.41 1411.95,915.35 1445.55,881.76 1470.61,906.81
TI_1V2 on PWR_A "R10_3_28_TI_1V2_152" (solid, pour order 152): 1445.55,913.77 1438.59,906.81 1446.85,898.55 1453.81,905.51
TI_1V2 on PWR_A "R10_3_28_TI_1V2_153" (solid, pour order 153): 1451.77,910.43 1441.93,910.43 1441.93,890.75 1451.77,890.75
TI_1V2 on PWR_A "R10_3_28_TI_1V2_154" (solid, pour order 154): 1446.85,902.63 1439.89,895.67 1466.54,869.02 1473.5,875.98
TI_1V2 on PWR_A "R10_3_28_TI_1V2_155" (solid, pour order 155): 1461.61,880.91 1461.61,871.06 1481.3,871.06 1481.3,880.91
TI_1V2 on PWR_A "R10_3_28_TI_1V2_156" (solid, pour order 156): 1469.88,878.48 1473.88,869.49 1491.73,877.42 1487.73,886.42
TI_1V2 on PWR_A "R10_3_28_TI_1V2_157" (solid, pour order 157): 1184.72,955.06 1194.54,954.41 1196.18,978.99 1186.36,979.65
TI_1V2 on PWR_A "R10_3_28_TI_1V2_158" (solid, pour order 158): 1186.02,969.49 1195.87,969.49 1195.87,1023.59 1186.02,1023.59
TI_1V2 on PWR_A "R10_3_28_TI_1V2_159" (solid, pour order 159): 1173.23,1000.95 1208.66,1000.95 1208.66,1061.02 1173.23,1061.02
TI_1V2 on PWR_A "R10_3_28_TI_1V2_160" (solid, pour order 160): 1165.89,1043.31 1190.94,1018.25 1245.53,1072.83 1220.47,1097.89
TI_1V2 on PWR_A "R10_3_28_TI_1V2_161" (solid, pour order 161): 1202.76,1055.12 1238.19,1055.12 1238.19,1195.88 1202.76,1195.88
TI_1V2 on PWR_A "R10_3_28_TI_1V2_162" (solid, pour order 162): 1215.55,1173.25 1225.39,1173.25 1225.39,1215.55 1215.55,1215.55
TI_1V2 on PWR_A "R10_3_28_TI_1V2_163" (solid, pour order 163): 1213.55,1211.36 1219.74,1203.71 1248.06,1226.63 1241.87,1234.28
TI_1V2 on PWR_A "R10_3_28_TI_1V2_164" (solid, pour order 164): 1234.19,1227.13 1241.37,1220.41 1288.47,1270.69 1281.28,1277.42
TI_1V2 on PWR_A "R10_3_28_TI_1V2_165" (solid, pour order 165): 1256.47,1269.65 1282.33,1245.42 1324.25,1290.19 1298.39,1314.41
TI_1V2 on PWR_A "R10_3_28_TI_1V2_166" (solid, pour order 166): 1281.5,1271.65 1316.93,1271.65 1316.93,1349.75 1281.5,1349.75
TI_1V2 on PWR_A "R10_3_28_TI_1V2_167" (solid, pour order 167): 1294.29,1327.11 1304.13,1327.11 1304.13,1382.87 1294.29,1382.87
TI_1V2 on PWR_A "R10_3_28_TI_1V2_168" (solid, pour order 168): 1295.52,1372.05 1305.11,1374.26 1299.95,1396.65 1290.36,1394.44
TI_1V2 on PWR_B "R10_3_28_TI_1V2_169" (solid, pour order 169): 1592.59,888.95 1585.46,895.74 1538.32,846.29 1545.44,839.5
TI_1V2 on PWR_B "R10_3_28_TI_1V2_170" (solid, pour order 170): 1550.2,851.38 1540.35,851.38 1540.35,840.96 1550.2,840.96
TI_1V2 on PWR_B "R10_3_28_TI_1V2_171" (solid, pour order 171): 1562.99,863.6 1527.56,863.6 1527.56,681.1 1562.99,681.1
TI_1V2 on PWR_B "R10_3_28_TI_1V2_172" (solid, pour order 172): 1545.28,723.87 1520.22,698.82 1624.02,595.02 1649.07,620.08
TI_1V2 on PWR_B "R10_3_28_TI_1V2_173" (solid, pour order 173): 1606.3,637.8 1606.3,602.36 2153.54,602.36 2153.54,637.8
TI_1V2 on PWR_B "R10_3_28_TI_1V2_174" (solid, pour order 174): 2110.78,620.77 2135.13,595.03 2190.8,647.7 2166.46,673.44
TI_1V2 on PWR_B "R10_3_28_TI_1V2_175" (solid, pour order 175): 2158.8,648.59 2165.57,641.44 2215.62,688.78 2208.85,695.93
TI_1V2 on PWR_B "R10_3_28_TI_1V2_176" (solid, pour order 176): 2267.25,754.36 2257.45,753.47 2259.32,732.84 2269.13,733.73
TI_1V2 on PWR_B "R10_3_28_TI_1V2_177" (solid, pour order 177): 2268.7,743.11 2258.86,743.11 2258.86,723.43 2268.7,723.43
TI_1V2 on PWR_B "R10_3_28_TI_1V2_178" (solid, pour order 178): 2263.78,735.31 2256.82,728.35 2290.89,694.28 2297.85,701.24
TI_1V2 on PWR_B "R10_3_28_TI_1V2_179" (solid, pour order 179): 2290.89,726.29 2265.84,701.24 2342.52,624.55 2367.57,649.61
TI_1V2 on PWR_B "R10_3_28_TI_1V2_180" (solid, pour order 180): 2324.8,667.32 2324.8,631.89 2547.24,631.89 2547.24,667.32
TI_1V2 on PWR_B "R10_3_28_TI_1V2_181" (solid, pour order 181): 2504.47,649.61 2529.53,624.55 2771.12,866.14 2746.06,891.2
TI_1V2 on PWR_B "R10_3_28_TI_1V2_182" (solid, pour order 182): 2728.35,848.43 2763.78,848.43 2763.78,1041.34 2728.35,1041.34
TI_1V2 on PWR_B "R10_3_28_TI_1V2_183" (solid, pour order 183): 2746.06,998.57 2771.12,1023.62 2529.53,1265.21 2504.47,1240.16
TI_1V2 on PWR_B "R10_3_28_TI_1V2_184" (solid, pour order 184): 2511.81,1222.44 2547.24,1222.44 2547.24,1280.17 2511.81,1280.17
TI_1V2 on PWR_B "R10_3_28_TI_1V2_185" (solid, pour order 185): 2524.61,1257.53 2534.45,1257.53 2534.45,1313.98 2524.61,1313.98
TI_1V2 on PWR_B "R10_3_28_TI_1V2_186" (solid, pour order 186): 2526.42,1302.83 2535.75,1305.94 2528.7,1327.09 2519.37,1323.98
TI_REGOUT_3V3 on PWR_B "R10_3_28_TI_REGOUT_3V3_187" (solid, pour order 187): 467.13,1750.36 478.94,1750.36 478.94,1793.67 467.13,1793.67
TI_REGOUT_3V3 on PWR_B "R10_3_28_TI_REGOUT_3V3_188" (solid, pour order 188): 467.13,1781.86 478.94,1781.86 478.94,1851.28 467.13,1851.28
TI_REGOUT_3V3 on PWR_B "R10_3_28_TI_REGOUT_3V3_189" (solid, pour order 189): 467.13,1839.47 478.94,1839.47 478.94,1882.78 467.13,1882.78
TI_REGOUT_3V3 on PWR_B "R10_3_28_TI_REGOUT_3V3_190" (solid, pour order 190): 1830.26,979.67 1839.22,971.99 1858.72,994.74 1849.75,1002.42
TI_REGOUT_3V3 on PWR_B "R10_3_28_TI_REGOUT_3V3_191" (solid, pour order 191): 1844.49,988.19 1856.3,988.19 1856.3,1009.84 1844.49,1009.84
TI_REGOUT_3V3 on PWR_B "R10_3_28_TI_REGOUT_3V3_192" (solid, pour order 192): 1851.32,1012.24 1842.09,1004.86 1865.22,975.95 1874.44,983.33
TI_REGOUT_3V3 on PWR_B "R10_3_28_TI_REGOUT_3V3_193" (solid, pour order 193): 1844.49,998.03 1856.3,998.03 1856.3,1029.53 1844.49,1029.53
TI_REGOUT_3V3 on PWR_B "R10_3_28_TI_REGOUT_3V3_194" (solid, pour order 194): 1842.04,1023.62 1850.39,1015.27 1877.45,1042.32 1869.09,1050.67
TI_REGOUT_3V3 on PWR_B "R10_3_28_TI_REGOUT_3V3_195" (solid, pour order 195): 465.57,1880.63 469.27,1869.41 489.74,1876.16 486.04,1887.38
TI_REGOUT_3V3 on PWR_B "R10_3_28_TI_REGOUT_3V3_196" (solid, pour order 196): 476.38,1885.83 476.38,1874.02 537.5,1874.02 537.5,1885.83
TI_REGOUT_3V3 on PWR_B "R10_3_28_TI_REGOUT_3V3_197" (solid, pour order 197): 507.97,1903.54 507.97,1856.3 653.54,1856.3 653.54,1903.54
TI_REGOUT_3V3 on PWR_B "R10_3_28_TI_REGOUT_3V3_198" (solid, pour order 198): 596.51,1879.92 629.92,1846.51 702.7,1919.29 669.29,1952.7
TI_REGOUT_3V3 on PWR_B "R10_3_28_TI_REGOUT_3V3_199" (solid, pour order 199): 645.67,1942.91 645.67,1895.67 786.07,1895.67 786.07,1942.91
TI_REGOUT_3V3 on PWR_B "R10_3_28_TI_REGOUT_3V3_200" (solid, pour order 200): 756.54,1925.2 756.54,1913.39 773.62,1913.39 773.62,1925.2
TI_REGOUT_3V3 on PWR_B "R10_3_28_TI_REGOUT_3V3_201" (solid, pour order 201): 767.68,1927.64 759.37,1919.26 805.94,1873.07 814.26,1881.45
TI_REGOUT_3V3 on PWR_B "R10_3_28_TI_REGOUT_3V3_202" (solid, pour order 202): 800.85,1888.06 799.26,1876.36 821.99,1873.28 823.58,1884.98
TI_REGOUT_3V3 on PWR_B "R10_3_28_TI_REGOUT_3V3_203" (solid, pour order 203): 811.02,1885.83 811.02,1874.02 870.77,1874.02 870.77,1885.83
TI_REGOUT_3V3 on PWR_B "R10_3_28_TI_REGOUT_3V3_204" (solid, pour order 204): 841.24,1903.54 841.24,1856.3 1037.4,1856.3 1037.4,1903.54
TI_REGOUT_3V3 on PWR_B "R10_3_28_TI_REGOUT_3V3_205" (solid, pour order 205): 980.37,1879.92 1013.78,1846.51 1057.03,1889.76 1023.62,1923.17
TI_REGOUT_3V3 on PWR_B "R10_3_28_TI_REGOUT_3V3_206" (solid, pour order 206): 1000,1913.39 1000,1866.14 1293.31,1866.14 1293.31,1913.39
TI_REGOUT_3V3 on PWR_B "R10_3_28_TI_REGOUT_3V3_207" (solid, pour order 207): 1269.68,1923.17 1236.28,1889.76 1338.58,1787.46 1371.99,1820.87
TI_REGOUT_3V3 on PWR_B "R10_3_28_TI_REGOUT_3V3_208" (solid, pour order 208): 1314.96,1844.49 1314.96,1797.24 1716.54,1797.24 1716.54,1844.49
TI_REGOUT_3V3 on PWR_B "R10_3_28_TI_REGOUT_3V3_209" (solid, pour order 209): 1692.91,1854.27 1659.51,1820.87 1712.6,1767.77 1746.01,1801.18
TI_REGOUT_3V3 on PWR_B "R10_3_28_TI_REGOUT_3V3_210" (solid, pour order 210): 1736.22,1824.8 1688.98,1824.8 1688.98,1767.72 1736.22,1767.72
TI_REGOUT_3V3 on PWR_B "R10_3_28_TI_REGOUT_3V3_211" (solid, pour order 211): 1712.6,1824.75 1679.19,1791.34 1722.44,1748.09 1755.85,1781.5
TI_REGOUT_3V3 on PWR_B "R10_3_28_TI_REGOUT_3V3_212" (solid, pour order 212): 1698.82,1805.12 1698.82,1757.87 1765.75,1757.87 1765.75,1805.12
TI_REGOUT_3V3 on PWR_B "R10_3_28_TI_REGOUT_3V3_213" (solid, pour order 213): 1742.13,1814.9 1708.72,1781.5 1840.55,1649.66 1873.96,1683.07
TI_REGOUT_3V3 on PWR_B "R10_3_28_TI_REGOUT_3V3_214" (solid, pour order 214): 1864.17,1706.69 1816.93,1706.69 1816.93,1610.24 1864.17,1610.24
TI_REGOUT_3V3 on PWR_B "R10_3_28_TI_REGOUT_3V3_215" (solid, pour order 215): 1840.55,1667.26 1807.14,1633.86 1878.69,1562.31 1912.1,1595.71
TI_REGOUT_3V3 on PWR_B "R10_3_28_TI_REGOUT_3V3_216" (solid, pour order 216): 1878.69,1604.07 1870.34,1595.71 1909.45,1556.61 1917.8,1564.96
TI_REGOUT_3V3 on PWR_B "R10_3_28_TI_REGOUT_3V3_217" (solid, pour order 217): 1916.92,1568.7 1905.71,1572.43 1897.06,1546.46 1908.26,1542.73
TI_REGOUT_3V3 on PWR_B "R10_3_28_TI_REGOUT_3V3_218" (solid, pour order 218): 1904.53,1583.6 1871.12,1550.2 2019.68,1401.63 2053.09,1435.04
TI_REGOUT_3V3 on PWR_B "R10_3_28_TI_REGOUT_3V3_219" (solid, pour order 219): 2043.31,1458.66 1996.06,1458.66 1996.06,1155.51 2043.31,1155.51
TI_REGOUT_3V3 on PWR_B "R10_3_28_TI_REGOUT_3V3_220" (solid, pour order 220): 2053.09,1179.13 2019.68,1212.54 1849.47,1042.32 1882.87,1008.92
TI_REGOUT_3V3 on PWR_B "R10_3_28_TI_REGOUT_3V3_221" (solid, pour order 221): 1906.5,1018.7 1906.5,1065.94 1845.47,1065.94 1845.47,1018.7
TI_REGOUT_3V3 on PWR_B "R10_3_28_TI_REGOUT_3V3_222" (solid, pour order 222): 2019.68,1212.54 1986.28,1179.13 2086.61,1078.8 2120.02,1112.2
TI_REGOUT_3V3 on PWR_B "R10_3_28_TI_REGOUT_3V3_223" (solid, pour order 223): 2062.99,1135.83 2062.99,1088.58 2437.01,1088.58 2437.01,1135.83
TI_3V3 on PWR_B "R10_3_28_TI_3V3_224" (solid, pour order 224): 1066.5,1060.55 1065.43,1048.79 1088.02,1046.73 1089.09,1058.5
TI_3V3 on PWR_B "R10_3_28_TI_3V3_225" (solid, pour order 225): 1076.77,1059.06 1076.77,1047.24 1108.27,1047.24 1108.27,1059.06
TI_3V3 on PWR_B "R10_3_28_TI_3V3_226" (solid, pour order 226): 1094.02,1052.73 1102.78,1044.81 1156.96,1104.75 1148.2,1112.67
TI_3V3 on PWR_B "R10_3_28_TI_3V3_227" (solid, pour order 227): 1143.68,1111.07 1141.89,1099.39 1166.36,1095.63 1168.15,1107.3
TI_3V3 on PWR_B "R10_3_28_TI_3V3_228" (solid, pour order 228): 1155.51,1108.27 1155.51,1096.46 1206.69,1096.46 1206.69,1108.27
TI_3V3 on PWR_B "R10_3_28_TI_3V3_229" (solid, pour order 229): 1200.79,1110.71 1192.44,1102.36 1220.47,1074.33 1228.82,1082.68
TI_3V3 on PWR_B "R10_3_28_TI_3V3_230" (solid, pour order 230): 1226.38,1088.58 1214.57,1088.58 1214.57,1047.24 1226.38,1047.24
TI_3V3 on PWR_B "R10_3_28_TI_3V3_231" (solid, pour order 231): 1221.15,1061.47 1212.15,1053.82 1236.53,1025.14 1245.53,1032.79
TI_3V3 on PWR_B "R10_3_28_TI_3V3_232" (solid, pour order 232): 1229.85,1029.51 1241.16,1026.11 1247.51,1047.27 1236.2,1050.66
TI_3V3 on PWR_B "R10_3_28_TI_3V3_233" (solid, pour order 233): 1234.25,1037.4 1246.06,1037.4 1246.06,1059.06 1234.25,1059.06
TI_3V3 on PWR_B "R10_3_28_TI_3V3_234" (solid, pour order 234): 1240.16,1044.8 1248.51,1053.15 1220.47,1081.19 1212.12,1072.83
TI_3V3 on PWR_B "R10_3_28_TI_3V3_235" (solid, pour order 235): 1214.57,1066.93 1226.38,1066.93 1226.38,1089.84 1214.57,1089.84
TI_3V3 on PWR_B "R10_3_28_TI_3V3_236" (solid, pour order 236): 1196.85,1060.31 1244.09,1060.31 1244.09,1165.35 1196.85,1165.35
TI_3V3 on PWR_B "R10_3_28_TI_3V3_237" (solid, pour order 237): 1187.07,1141.73 1220.47,1108.33 1277.98,1165.83 1244.57,1199.24
TI_3V3 on PWR_B "R10_3_28_TI_3V3_238" (solid, pour order 238): 1236.22,1165.83 1244.57,1157.48 1258.35,1171.26 1250,1179.61
TI_3V3 on PWR_B "R10_3_28_TI_3V3_239" (solid, pour order 239): 1244.09,1177.17 1244.09,1165.35 1265.75,1165.35 1265.75,1177.17
TI_3V3 on PWR_B "R10_3_28_TI_3V3_240" (solid, pour order 240): 1259.84,1179.61 1251.49,1171.26 1269.68,1153.07 1278.04,1161.42
TI_3V3 on PWR_B "R10_3_28_TI_3V3_241" (solid, pour order 241): 1263.78,1167.32 1263.78,1155.51 1295.28,1155.51 1295.28,1167.32
TI_3V3 on PWR_B "R10_3_28_TI_3V3_242" (solid, pour order 242): 1287.17,1169.47 1281.31,1159.22 1298.46,1149.42 1304.32,1159.68
TI_3V3 on PWR_B "R10_3_28_TI_3V3_243" (solid, pour order 243): 1295.67,1165.81 1287.93,1156.89 1330.24,1120.17 1337.98,1129.09
TI_3V3 on PWR_B "R10_3_28_TI_3V3_244" (solid, pour order 244): 1327.3,1161.82 1296.33,1126.14 1350.78,1078.88 1381.75,1114.56
TI_3V3 on PWR_B "R10_3_28_TI_3V3_245" (solid, pour order 245): 1372.05,1135.83 1324.8,1135.83 1324.8,1069.22 1372.05,1069.22
TI_3V3 on PWR_B "R10_3_28_TI_3V3_246" (solid, pour order 246): 1348.03,1100.86 1340.08,1092.12 1381.3,1054.65 1389.25,1063.39
TI_3V3 on PWR_A "R10_3_28_TI_3V3_247" (solid, pour order 247): 1372.56,1062.73 1381.16,1054.64 1429.7,1106.28 1421.09,1114.37
TI_3V3 on PWR_A "R10_3_28_TI_3V3_248" (solid, pour order 248): 1387.96,1104.99 1422.39,1072.63 1460.56,1113.24 1426.13,1145.6
TI_3V3 on PWR_A "R10_3_28_TI_3V3_249" (solid, pour order 249): 1403.54,1135.83 1403.54,1088.58 1490.16,1088.58 1490.16,1135.83
TI_3V3 on PWR_A "R10_3_28_TI_3V3_250" (solid, pour order 250): 1433.13,1112.2 1466.54,1078.8 1598.37,1210.63 1564.96,1244.04
TI_3V3 on PWR_A "R10_3_28_TI_3V3_251" (solid, pour order 251): 1541.34,1234.25 1541.34,1187.01 1716.54,1187.01 1716.54,1234.25
TI_3V3 on PWR_A "R10_3_28_TI_3V3_252" (solid, pour order 252): 1659.51,1210.63 1692.91,1177.22 1785.38,1269.68 1751.97,1303.09
TI_3V3 on PWR_A "R10_3_28_TI_3V3_253" (solid, pour order 253): 1728.35,1293.31 1728.35,1246.06 1795.28,1246.06 1795.28,1293.31
TI_3V3 on PWR_A "R10_3_28_TI_3V3_254" (solid, pour order 254): 1773.47,1303.04 1738.3,1271.5 1781.59,1223.21 1816.77,1254.75
TI_3V3 on PWR_A "R10_3_28_TI_3V3_255" (solid, pour order 255): 1783.87,1264.91 1775.07,1257.02 1822.38,1204.26 1831.17,1212.14
TI_3V3 on PWR_A "R10_3_28_TI_3V3_256" (solid, pour order 256): 1823.25,1204.26 1831.18,1213.02 1781.08,1258.34 1773.15,1249.58
TI_3V3 on PWR_A "R10_3_28_TI_3V3_257" (solid, pour order 257): 1775.59,1244.09 1787.4,1244.09 1787.4,1259.21 1775.59,1259.21
TI_3V3 on PWR_A "R10_3_28_TI_3V3_258" (solid, pour order 258): 1757.87,1229.69 1805.12,1229.69 1805.12,1283.46 1757.87,1283.46
TI_3V3 on PWR_A "R10_3_28_TI_3V3_259" (solid, pour order 259): 1781.5,1226.44 1814.9,1259.84 1771.65,1303.09 1738.25,1269.68
TI_3V3 on PWR_A "R10_3_28_TI_3V3_260" (solid, pour order 260): 1795.28,1246.06 1795.28,1293.31 1718.5,1293.31 1718.5,1246.06
TI_3V3 on PWR_A "R10_3_28_TI_3V3_261" (solid, pour order 261): 1775.53,1269.68 1742.13,1303.09 1649.66,1210.63 1683.07,1177.22
TI_3V3 on PWR_A "R10_3_28_TI_3V3_262" (solid, pour order 262): 1706.69,1187.01 1706.69,1234.25 1531.5,1234.25 1531.5,1187.01
TI_3V3 on PWR_A "R10_3_28_TI_3V3_263" (solid, pour order 263): 1588.52,1210.63 1555.12,1244.04 1403.6,1092.52 1437.01,1059.11
TI_3V3 on PWR_A "R10_3_28_TI_3V3_264" (solid, pour order 264): 1460.63,1068.9 1460.63,1116.14 1403.19,1116.14 1403.19,1068.9
TI_3V3 on PWR_A "R10_3_28_TI_3V3_265" (solid, pour order 265): 1432.72,1086.61 1432.72,1098.43 1401.57,1098.43 1401.57,1086.61
TI_3V3 on PWR_A "R10_3_28_TI_3V3_266" (solid, pour order 266): 1415.82,1092.96 1407.04,1100.86 1372.57,1062.55 1381.34,1054.65
TI_3V3 on PWR_B "R10_3_28_TI_3V3_267" (solid, pour order 267): 1386.81,1057.09 1386.81,1068.9 1342.52,1068.9 1342.52,1057.09
TI_3V3 on PWR_B "R10_3_28_TI_3V3_268" (solid, pour order 268): 1348.43,1054.64 1356.78,1062.99 1338.58,1081.19 1330.23,1072.83
TI_3V3 on PWR_B "R10_3_28_TI_3V3_269" (solid, pour order 269): 1344.49,1066.93 1344.49,1078.74 1320.02,1078.74 1320.02,1066.93
TI_3V3 on PWR_B "R10_3_28_TI_3V3_270" (solid, pour order 270): 1349.55,1049.21 1349.55,1096.46 1295.28,1096.46 1295.28,1049.21
TI_3V3 on PWR_B "R10_3_28_TI_3V3_271" (solid, pour order 271): 1352.3,1072.83 1318.9,1106.24 1275.65,1062.99 1309.06,1029.59
TI_3V3 on PWR_B "R10_3_28_TI_3V3_272" (solid, pour order 272): 1309.06,1029.59 1342.46,1062.99 1259.84,1145.61 1226.44,1112.2
TI_3V3 on PWR_B "R10_3_28_TI_3V3_273" (solid, pour order 273): 1283.46,1088.58 1283.46,1135.83 1009.84,1135.83 1009.84,1088.58
TI_3V3 on PWR_B "R10_3_28_TI_3V3_274" (solid, pour order 274): 1066.87,1112.2 1033.46,1145.61 990.22,1102.36 1023.62,1068.96
TI_3V3 on PWR_B "R10_3_28_TI_3V3_275" (solid, pour order 275): 1047.24,1078.74 1047.24,1125.98 960.63,1125.98 960.63,1078.74
TI_3V3 on PWR_B "R10_3_28_TI_3V3_276" (solid, pour order 276): 1017.66,1102.36 984.25,1135.77 891.79,1043.31 925.2,1009.9
TI_3V3 on PWR_B "R10_3_28_TI_3V3_277" (solid, pour order 277): 948.82,1066.93 901.57,1066.93 901.57,921.26 948.82,921.26
TI_3V3 on PWR_B "R10_3_28_TI_3V3_278" (solid, pour order 278): 925.2,978.29 891.79,944.88 1072.83,763.84 1106.24,797.24
TI_3V3 on PWR_B "R10_3_28_TI_3V3_279" (solid, pour order 279): 1049.21,820.87 1049.21,773.62 1381.89,773.62 1381.89,820.87
TI_3V3 on PWR_B "R10_3_28_TI_3V3_280" (solid, pour order 280): 1358.27,830.65 1324.86,797.24 1515.75,606.36 1549.15,639.76
TI_3V3 on PWR_B "R10_3_28_TI_3V3_281" (solid, pour order 281): 1539.37,663.39 1492.13,663.39 1492.13,596.46 1539.37,596.46
TI_3V3 on PWR_B "R10_3_28_TI_3V3_282" (solid, pour order 282): 1515.75,653.49 1482.34,620.08 1663.39,439.03 1696.79,472.44
TI_3V3 on PWR_B "R10_3_28_TI_3V3_283" (solid, pour order 283): 1629.98,472.44 1663.39,439.03 1814.9,590.55 1781.5,623.96
TI_3V3 on PWR_B "R10_3_28_TI_3V3_284" (solid, pour order 284): 1757.87,614.17 1757.87,566.93 2543.31,566.93 2543.31,614.17
TI_3V3 on PWR_B "R10_3_28_TI_3V3_285" (solid, pour order 285): 2486.28,590.55 2519.68,557.14 2809,846.46 2775.59,879.86
TI_3V3 on PWR_B "R10_3_28_TI_3V3_286" (solid, pour order 286): 2751.97,822.83 2799.21,822.83 2799.21,1235.15 2751.97,1235.15
TI_3V3 on PWR_B "R10_3_28_TI_3V3_287" (solid, pour order 287): 2769.68,1205.62 2781.5,1205.62 2781.5,1226.38 2769.68,1226.38
TI_3V3 on PWR_B "R10_3_28_TI_3V3_288" (solid, pour order 288): 2775.59,1212.12 2783.94,1220.47 2746.06,1258.35 2737.71,1250
TI_3V3 on PWR_B "R10_3_28_TI_3V3_289" (solid, pour order 289): 2754.41,1250 2746.06,1258.35 2731.81,1244.09 2740.16,1235.74
TI_PMICOUT_1V8 on PWR_B "R10_3_28_TI_PMICOUT_1V8_290" (solid, pour order 290): 1806.03,915.18 1813.17,908.4 1857.35,954.9 1850.22,961.68
TI_PMICOUT_1V8 on PWR_B "R10_3_28_TI_PMICOUT_1V8_291" (solid, pour order 291): 1845.47,959.65 1845.47,949.8 1860.07,949.8 1860.07,959.65